# Altium PCB WSN_Enviroment Monitoring system.PcbDoc (part 2 of 2)
Units mil, origin at the board's own origin, x right, y up, seen from the top; angles counter-clockwise.
Board outline 1950 x 3410 mil, 2 copper layers (Top Layer, Bottom Layer); 31 components, 32 nets, 211 pads, 40 vias.
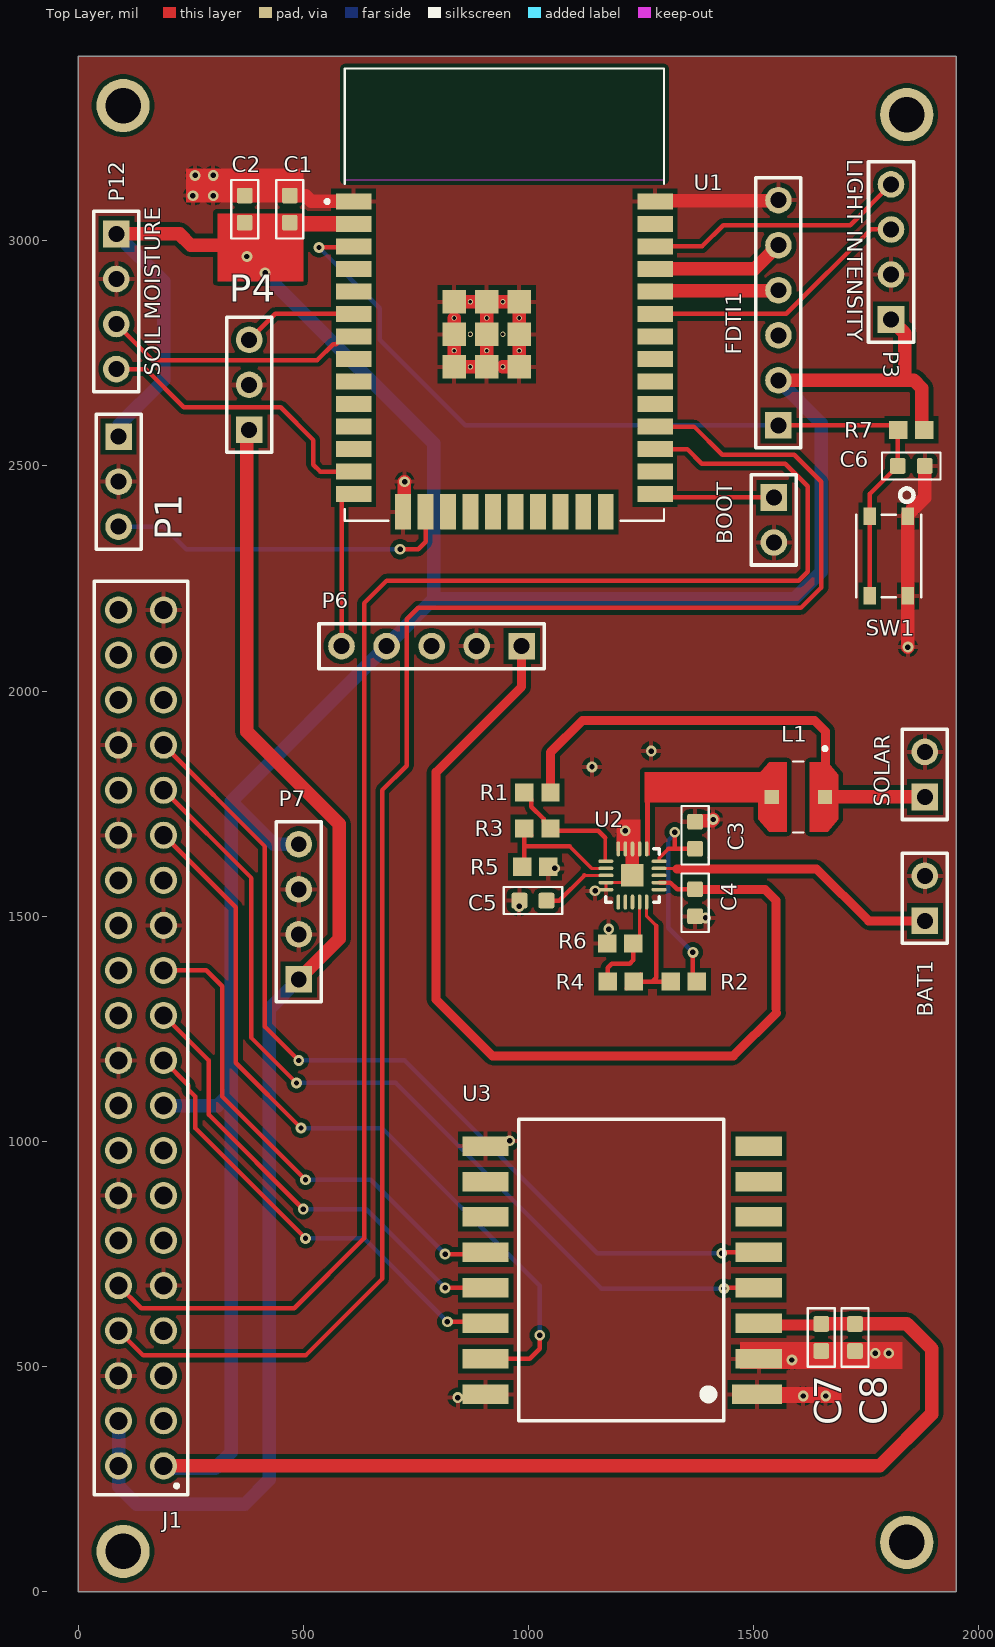
[diagram p0: Top Layer view]

## Via types
v1: diameter 24, hole 12, Top Layer to Bottom Layer, tented both sides, 40 vias

## Nets (pads, with @x,y where several pads share a name; then routed paths per layer and width w, separated by ;. In a path a pad name is that pad's centre, name@x,y a point inside that pad or via, vN(x,y) a via of type N, cw(c..) or ccw(c..) an arc to the next point about the centre after c; other vN are vias at no path point) (continued)
NetR2_1: (continued)
  Top Layer w7: U2.10 1262.44,1499.96 1283.7,1478.7
  Top Layer w10: R4.2@1218.46,1339.92 1233.54,1355 R4.2 R4.2@1234.33,1355 ; R4.2@1249.41,1370.87 1249.41,1370.08 R4.2@1234.33,1355 ; 1283.7,1478.7 1283.7,1363.5 1275.2,1355 ; R2.1 1275.2,1355 ; R4.2@1234.33,1355 1275.2,1355
NetR3_1: R3.1 R5.2 U2.2 | length 292.7
  Top Layer w7: 1140.16,1606.5 U2.2
  Top Layer w8: 1091.57,1655.08 1140.16,1606.5
  Top Layer w10: R5.2@991.06,1625 991.06,1655.08 ; R3.1@1006.54,1679.92 991.46,1695 R3.1 991.06,1655.08 ; 1091.57,1655.08 991.06,1655.08
NetR4_1: R4.1 R6.2 U2.9 | length 234.9
  Top Layer w7: R6.2@1246.69,1453.82 U2.9
  Top Layer w10: R4.1@1180,1358.94 R4.1 1176.06,1386.06 1185,1395 1225,1395 1232.87,1402.87 R6.2 R6.2@1246.69,1453.82
NSS: J1.29 U3.15 | length 1720.6
  Top Layer w10: J1.29 350,1520 350,1175 v1(495,1030) ; U3.15 1002.52,517.52 1025,540 v1(1025,570)
  Bottom Layer w10: v1(495,1030) 675,1030 1025,680 v1(1025,570)
RESET: C6.1 FDTI1.1 R7.1 SW1.3 SW1.4 U1.3 | length 1967.7
  Top Layer w10: v1(535,2985) 609.45,2985 U1.3 ; FDTI1.1 1811.06,2590 R7.1 1820,2578.94 C6.1 1757.68,2437.68 SW1.3 SW1.4
  Bottom Layer w10: v1(535,2985) 670,2850 670,2780 860,2590 FDTI1.1
RST: J1.31 U3.4 | length 1987.5
  Top Layer w10: J1.31 385,1585 385,1230 v1(485,1130) ; v1@1433.91,675 U3.4
  Bottom Layer w10: v1(485,1130) 705,1130 1161.32,673.68 v1(1433.91,673.68)
RXD0: FDTI1.4 U1.34 | length 274.8
  Top Layer w30: U1.34 1282.5,2888.76 1553.76,2888.76 FDTI1.4
SCL: P3.4 U1.36 | length 580.7
  Top Layer w10: U1.36 1385.4,2987.52 1432.41,3034.53 1714.53,3034.53 P3.4
SCLK: J1.23 U3.12 | length 1121
  Top Layer w10: J1.23 285,1380 320,1345 320,1100 v1(505,915) ; v1(815,750) 901.26,750 U3.12
  Bottom Layer w10: v1(505,915) 650,915 v1(815,750)
SDA: P3.3 U1.33 | length 601.4
  Top Layer w10: U1.33 1572.52,2837.52 1760,3025 P3.3
SOIL_AO: P12.3 U1.7 | length 581.9
  Top Layer w10: P12.3 165,2735 531.15,2735 566.39,2770.24 573.03,2770.24 590.32,2787.52 U1.7
SOIL_DO: P12.4 U1.13 | length 653.4
  Top Layer w10: P12.4 150,2715 235,2630 450,2630 522.5,2557.5 522.5,2502.5 537.48,2487.52 U1.13
TXD0: FDTI1.5 U1.35 | length 295.5
  Top Layer w30: U1.35 1502.08,2937.52 1554.56,2990 FDTI1.5
VBAT: BAT1.1 U2.14 | length 638.3
  Top Layer w7: U2.14 1328.5,1606.5
  Top Layer w10: 1328.5,1606.5 1330,1605
  Top Layer w20: 1330,1605 1395,1605 1640,1605 1755,1490 BAT1.1
pads on no net: FDTI1.3 J1.3 J1.5 J1.7 J1.11 J1.12 J1.13 J1.15 J1.16 J1.18 J1.22 J1.24 J1.26 J1.27 J1.28 J1.32 J1.35 J1.36 J1.37 J1.38 J1.40 P6.3 U1.4 U1.5 U1.8 U1.9 U1.10 U1.11 U1.12 U1.17 U1.18 U1.19 U1.20 U1.21 U1.22 U1.23 U1.24 U1.26 U1.29 U1.30 U1.31 U1.32 U1.37 U2.6 U2.7 U2.8 U2.11 U2.13 U3.6 U3.7 U3.8 U3.10 U3.11

## Polygon pours and split planes (outlines as drawn)
GND on Bottom Layer "GND_L02_P000" (solid, pour order 0): 0,0 0,3410 1950,3410 1950,0
GND on Top Layer "GND_L01_P001" (solid, pour order 1): 0,0 0,3410 1950,3410 1950,0

## Other copper
Top Layer:
  rectangle net GND: 1195,1645 1248.43,1715
  rectangle net GND: 1465,420 1695,455
  rectangle net GND: 1470,495 1660,555
  rectangle net +3V3_DRV: 1490,580 1820,605
  rectangle net GND: 1625,495 1830,555
  region net NetL1_2: 1563.36,1753.28 1563.36,1820 1258.03,1820 1258.03,1753.28
  rectangle net NetL1_2: 1258.62,1635 1270,1815
  rectangle net GND: 240,3085 500,3160
  rectangle net +3V3_DRV: 480,3020 645,3055
  rectangle net +3V3_DRV: 310,2910 500,3060
Bottom Layer:
  rectangle net +3V3_DRV: 330,2910 485,2980

## Silkscreen, mask and mechanical layers (free items; w line width, h text height)
Top Overlay:
  text "SOIL MOISTURE" at 195,2700 h60 r90
Mechanical 1:
  lines w5: 0,3410 1950,3410 1950,0 0,0 0,3410 ; 0,3410 0,3410

## Text inside footprints (layer, text, board x,y; h text height)
U1: Mechanical 13 "ANTENNA" at 710.39,3234.76 h70